# Altium PCB PCB1.PcbDoc (part 2 of 2)
Units mm, origin at the board's own origin, x right, y up, seen from the top; angles counter-clockwise.
Board outline 185 x 38 mm, 4 copper layers (Top Layer, POWER, GND, Bottom Layer), stack 0.603 mm thick; 116 components, 81 nets, 423 pads, 394 vias.
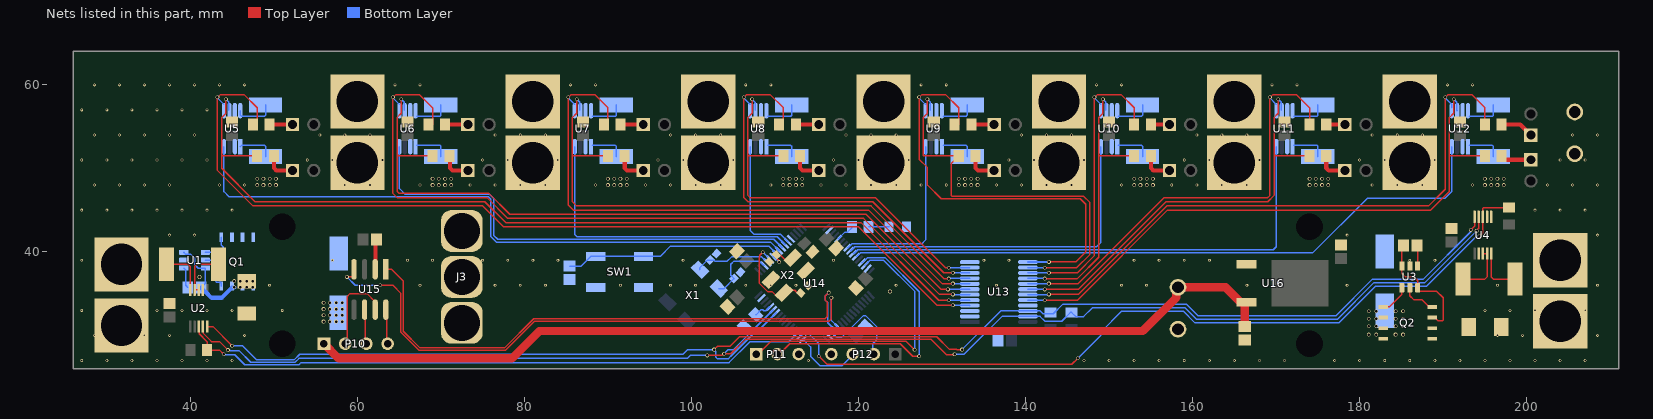
[diagram p4: the nets of this part, all layers, seen from the top]

## Via types
v1: diameter 0.35, hole 0.2, Top Layer to Bottom Layer, tented both sides, 221 vias
v2: diameter 0.45, hole 0.3, Top Layer to Bottom Layer, tented both sides, 171 vias
v3: diameter 0.5, hole 0.35, Top Layer to Bottom Layer, tented both sides, 2 vias

## Nets (pads, with @x,y where several pads share a name; then routed paths per layer and width w, separated by ;. In a path a pad name is that pad's centre, name@x,y a point inside that pad or via, vN(x,y) a via of type N, cw(c..) or ccw(c..) an arc to the next point about the centre after c; other vN are vias at no path point) (continued)
+5: C27.1 J2.1 P10.1 U16.3 | length 119
  Top Layer w0.5: U16.3@165.75,33.97 U16.3@166.45,33.97 U16.3@166.25,33.77
  Top Layer w1: P10.1@56,29 57.75,27.25 78.5,27.25 81.78,30.53 154.03,30.53 158.059,34.559 158.059,35.559 J2.1@158.25,35.75 163.97,35.75 U16.3@165.75,33.97 ; C27.1@166.25,31.056 U16.3@166.25,33.77
ALERT1: R4.1 U4.3 U14.50 | length 98.5
  Top Layer w0.18: v2(115.25,27.5) 116.217,26.533 145.533,26.533 v2(146.25,27.25) ; v2(194.315,41.87) 194.358,41.87 194.75,42.262 U4.3@194.75,44.2 194.75,45.195 194.855,45.3 R4.1@197.9,45.3
  Bottom Layer w0.18: U14.50@112.982,29.886 113.067,29.886 113.534,30.353 113.897,30.353 115.25,29 v2(115.25,27.5) ; v2(146.25,27.25) 149.022,30.022 149.022,30.422 151.492,32.892 158.892,32.892 160.284,31.5 177.5,31.5 181.89,35.89 187.998,35.89 193.978,41.87 v2(194.315,41.87)
ALERT2: R2.1 U2.3 U14.51 | length 76.1
  Top Layer w0.18: U2.3@41,31.05 41.06,30.99 41.06,30.19 42,29.25 R2.1@42,28.25 43.5,28.25 v2(44,27.75)
  Bottom Layer w0.18: v2(44,27.75) 44.052,27.698 44.247,27.698 44.264,27.681 45.319,27.681 46.504,26.496 52.998,26.496 53.252,26.75 104.5,26.75 107,29.25 111.639,29.25 U14.51@112.629,30.24
CAN_RX: U14.44 U15.4 | length 73.9
  Top Layer w0.18: v2(58.75,37) 58.79,37.04 59.391,37.04 59.595,37.244 U15.4@59.595,37.914 ; v2(62.75,36) 64.25,36 65.22,35.03 65.22,30.384 67.384,28.22 77.72,28.22 81.2,31.7 116.45,31.7 116.75,32 v2(116.75,34.5)
  Bottom Layer w0.18: v2(58.75,37) 59.75,36 v2(62.75,36) ; v2(116.75,34.5) 116.75,31.775 U14.44@117.578,30.947
CAN_TX: U14.45 U15.1 | length 70.2
  Top Layer w0.18: U15.1@63.405,37.914 64.086,37.914 65.5,36.5 65.5,30.5 67.5,28.5 77.604,28.5 81.104,32 116,32 116.25,32.25 116.25,34 116,34.25 116,34.695 v2(116.435,35.13)
  Bottom Layer w0.18: v2(116.435,35.13) 116,34.695 116,34.25 116.306,33.944 116.306,31.512 U14.45@117.225,30.593
GND: C2.1 C3.1 C5.1 C6.1 C7.1 C8.1 C9.1 C10.1 C11.1 C12.1 C13.1 C14.1 C15.2 C16.1 C17.1 C18.2 C19.1 C20.2 C21.2 C22.2 C23.2 C24.2 C25.2 C26.1 C27.2 C28.2 C29.1 D1.2 D2.2 D19.1 J1.2 J2.2 J3.2 P1.2 P2.2 P3.2 P4.2 P5.2 P6.2 P7.2 P8.2 P9.2 P10.4 P11.3 P12.4 R31.1 SW1.1 SW1.2 U1.2 U2.7 U3.2 U4.1 U4.2 U4.7 U5.2 U5.7 U6.2 U6.7 U7.2 U7.7 U8.2 U8.7 U9.2 U9.7 U10.2 U10.7 U11.2 U11.7 U12.2 U12.7 U13.2 U13.3 U13.12 U13.21 U14.12 U14.18 U14.31 U14.47 U14.63 U15.2 U15.8 U16.1 X2.2 X2.4 | length 7.8
  Top Layer w0.18: U15.8@63.405,33.086 63.49,33.002 63.49,29.13 P10.4@63.62,29
  Top Layer w0.5: U15.2@62.135,37.914 62.158,37.937 62.158,41.353 C26.1@62.306,41.5
  other v1: 27,27 30,27 33,27 36,27 39,27 42,27 45,27 114,27 147,27 150,27 153,27 156,27 159,27 162,27 165,27 168,27 171,27 177,27 180,27 183,27 186,27 189,27 192,27 195,27 198,27 201,27 204,27 207,27 28.5,30 34.5,30 37.5,30 46.5,30 196.5,30 199.5,30 208.5,30 27,33 36,33 39,33 42,33 45,33 51,33 195,33 198,33 201,33 207,33 49.5,36 67.5,36 76.5,36 79.5,36 82.5,36 91.5,36 97.5,36 100.5,36 106.5,36 109.5,36 112.5,36 124.5,36 136.5,36 151.5,36 154.5,36 166.5,36 178.5,36 196.5,36 208.5,36 27,39 57,39 66,39 69,39 75,39 78,39 81,39 84,39 99,39 117,39 135,39 138,39 153,39 156,39 159,39 162,39 186,39 189,39 37.5,42 40.5,42 178.5,42 208.5,42 27,45 30,45 33,45 36,45 39,45 42,45 45,45 201,45 204,45 207,45 28.5,48 31.5,48 34.5,48 37.5,48 43.5,48 46.5,48 58.5,48 61.5,48 67.5,48 73.5,48 76.5,48 79.5,48 82.5,48 88.5,48 94.5,48 97.5,48 100.5,48 103.5,48 109.5,48 115.5,48 118.5,48 121.5,48 124.5,48 127.5,48 130.5,48 136.5,48 139.5,48 142.5,48 145.5,48 151.5,48 157.5,48 160.5,48 163.5,48 166.5,48 181.5,48 184.5,48 187.5,48 193.5,48 202.5,48 205.5,48 208.5,48 27,51 30,51 33,51 36,51 39,51 42,51 54,51 57,51 63,51 75,51 78,51 84,51 96,51 99,51 105,51 117,51 120,51 126,51 138,51 141,51 147,51 159,51 162,51 168,51 180,51 183,51 189,51 204,51 207,51 28.5,54 31.5,54 34.5,54 37.5,54 40.5,54 55.5,54 58.5,54 61.5,54 76.5,54 79.5,54 82.5,54 97.5,54 100.5,54 103.5,54 118.5,54 121.5,54 124.5,54 139.5,54 142.5,54 145.5,54 160.5,54 163.5,54 166.5,54 181.5,54 184.5,54 187.5,54 205.5,54 208.5,54 27,57 30,57 33,57 36,57 39,57 42,57 28.5,60 31.5,60 34.5,60 37.5,60 40.5,60 43.5,60 46.5,60 64.5,60 67.5,60 85.5,60 88.5,60 106.5,60 109.5,60 127.5,60 130.5,60 148.5,60 151.5,60 169.5,60 172.5,60 190.5,60 193.5,60
  other v3: 123.75,35.25 41.1,37
GS1.1: R13.1 U5.5 U13.4 | length 114.1
  Top Layer w0.18: v2(43.25,58.5) 43.25,49.75 47.5,45.5 75,45.5 77.5,43 120,43 129.4,33.6 v2(131.3,33.6) ; v2@43.272,58.5 43.611,58.839 46.411,58.839 48,57.25 R13.1@48,55.25
  Bottom Layer w0.18: v2@43.25,58.428 U5.5@44.025,57.653 ; v2(131.3,33.6) 131.312,33.587 133.312,33.587 U13.4@133.325,33.575
GS1.2: R14.1 U5.6 U13.5 | length 110.3
  Top Layer w0.18: v2(44.257,58.27) 44.257,56.603 43.75,56.096 43.75,51.5 ; R14.1@48,51.5 43.75,51.5 ; v2(130.8,34.2) 129.6,34.2 120.3,43.5 77.75,43.5 75.25,46 47.75,46 43.75,50 43.75,51.5
  Bottom Layer w0.18: v2(44.257,58.27) 44.614,57.913 U5.6@44.614,56.962 ; v2(130.8,34.2) 130.813,34.213 133.312,34.213 U13.5@133.325,34.225
GS2.1: R15.1 U6.5 U13.6 | length 94.2
  Top Layer w0.18: v2(64.25,58.5) 64.25,47 64.75,46.5 75.5,46.5 78,44 120.6,44 129.7,34.9 v2(131.3,34.9) ; v2@64.272,58.5 64.611,58.839 67.411,58.839 69,57.25 R15.1@69,55.25
  Bottom Layer w0.18: v2@64.25,58.428 U6.5@65.025,57.653 ; v2(131.3,34.9) 131.312,34.888 133.312,34.888 U13.6@133.325,34.875
GS2.2: R16.1 U6.6 U13.7 | length 90.4
  Top Layer w0.18: v2(65.257,58.27) 65.257,56.603 64.75,56.096 64.75,51.5 ; R16.1@69,51.5 64.75,51.5 ; v2(130.7,35.5) 129.9,35.5 120.9,44.5 78.25,44.5 75.75,47 65,47 64.75,47.25 64.75,51.5
  Bottom Layer w0.18: v2(65.257,58.27) 65.614,57.913 U6.6@65.614,56.962 ; v2(130.7,35.5) 130.713,35.513 133.312,35.513 U13.7@133.325,35.525
GS3.1: R17.1 U7.5 U13.8 | length 73.5
  Top Layer w0.18: v2(85.25,58.5) 85.25,45.605 85.855,45 121.2,45 130,36.2 v2(131.3,36.2) ; v2@85.272,58.5 85.611,58.839 88.411,58.839 90,57.25 R17.1@90,55.25
  Bottom Layer w0.18: v2@85.25,58.428 U7.5@86.025,57.653 ; v2(131.3,36.2) 131.312,36.187 133.312,36.187 U13.8@133.325,36.175
GS3.2: R18.1 U7.6 U13.9 | length 69.6
  Top Layer w0.18: v2(86.257,58.27) 86.257,56.603 85.75,56.096 85.75,51.5 ; R18.1@90,51.5 85.75,51.5 ; v2(130.8,36.8) 130.2,36.8 121.5,45.5 86.25,45.5 85.75,46 85.75,51.5
  Bottom Layer w0.18: v2(86.257,58.27) 86.614,57.913 U7.6@86.614,56.962 ; v2(130.8,36.8) 130.813,36.813 133.312,36.813 U13.9@133.325,36.825
GS4.1: R19.1 U8.5 U13.10 | length 51.4
  Top Layer w0.18: v2(106.25,58.5) 106.25,46.5 106.75,46 121.7,46 130.2,37.5 v2(131.3,37.5) ; v2@106.272,58.5 106.611,58.839 109.411,58.839 111,57.25 R19.1@111,55.25
  Bottom Layer w0.18: v2@106.25,58.428 U8.5@107.025,57.653 ; v2(131.3,37.5) 131.312,37.488 133.312,37.488 U13.10@133.325,37.475
GS4.2: R20.1 U8.6 U13.11 | length 47.6
  Top Layer w0.18: v2(107.257,58.27) 107.257,56.603 106.75,56.096 106.75,51.423 ; R20.1@111,51.5 106.827,51.5 106.75,51.423 ; v2(130.8,38.1) 130.4,38.1 122,46.5 107,46.5 106.75,46.75 106.75,51.423
  Bottom Layer w0.18: v2(107.257,58.27) 107.614,57.913 U8.6@107.614,56.962 ; v2(130.8,38.1) 130.813,38.113 133.312,38.113 U13.11@133.325,38.125
GS5.1: R21.1 U9.5 U13.13 | length 52.6
  Top Layer w0.18: v2(127.25,58.5) 127.25,51.1 128.25,50.1 128.25,48 129.897,46.353 146.547,46.353 147.2,45.7 147.2,40 146,38.8 v2(142.8,38.8) ; v2@127.272,58.5 127.611,58.839 130.411,58.839 132,57.25 R21.1@132,55.25
  Bottom Layer w0.18: v2@127.25,58.428 U9.5@128.025,57.653 ; U13.13@140.275,38.775 140.288,38.788 142.787,38.788 v2(142.8,38.8)
GS5.2: R22.1 U9.6 U13.14 | length 49
  Top Layer w0.18: v2(128.257,58.27) 128.257,56.603 127.75,56.096 127.75,51.5 R22.1@132,51.5 131.117,50.617 131.117,46.739 131.222,46.633 146.967,46.633 147.7,45.9 147.7,39.7 146.1,38.1 v2(142.3,38.1)
  Bottom Layer w0.18: v2(128.257,58.27) 128.614,57.913 U9.6@128.614,56.962 ; U13.14@140.275,38.125 140.288,38.113 142.287,38.113 v2(142.3,38.1)
GS6.1: R23.1 U10.5 U13.15 | length 36.4
  Top Layer w0.18: v2(142.8,37.5) 146.2,37.5 148.25,39.55 v2(148.25,58.5) ; v2@148.272,58.5 148.611,58.839 151.411,58.839 153,57.25 R23.1@153,55.25
  Bottom Layer w0.18: U13.15@140.275,37.475 142.775,37.475 v2(142.8,37.5) ; v2@148.25,58.428 U10.5@149.025,57.653
GS6.2: R24.1 U10.6 U13.16 | length 34.4
  Top Layer w0.18: v2(142.3,36.8) 146.2,36.8 148.75,39.35 148.75,51.5 ; v2(149.257,58.27) 149.257,56.603 148.75,56.096 148.75,51.5 ; R24.1@153,51.5 148.75,51.5
  Bottom Layer w0.18: U13.16@140.275,36.825 140.288,36.813 142.287,36.813 v2(142.3,36.8) ; v2(149.257,58.27) 149.614,57.913 U10.6@149.614,56.962
GS7.1: R25.1 U11.5 U13.17 | length 53.7
  Top Layer w0.18: v2(142.8,36.2) 146.3,36.2 156.6,46.5 169,46.5 169.25,46.75 v2(169.25,58.5) ; v2@169.272,58.5 169.611,58.839 172.411,58.839 174,57.25 R25.1@174,55.25
  Bottom Layer w0.18: U13.17@140.275,36.175 140.288,36.188 142.787,36.188 v2(142.8,36.2) ; v2@169.25,58.428 U11.5@170.025,57.653
GS7.2: R26.1 U11.6 U13.18 | length 51.6
  Top Layer w0.18: v2(142.3,35.5) 146.3,35.5 156.8,46 169,46 169.75,46.75 169.75,51.5 ; v2(170.257,58.27) 170.257,56.603 169.75,56.096 169.75,51.5 ; R26.1@174,51.5 169.75,51.5
  Bottom Layer w0.18: U13.18@140.275,35.525 140.288,35.513 142.287,35.513 v2(142.3,35.5) ; v2(170.257,58.27) 170.614,57.913 U11.6@170.614,56.962
GS8.1: R27.1 U12.5 U13.19 | length 75.3
  Top Layer w0.18: v2(142.8,34.9) 146.3,34.9 156.9,45.5 188.25,45.5 190.25,47.5 v2(190.25,58.5) 190.272,58.5 190.611,58.839 193.411,58.839 195,57.25 R27.1@195,55.25
  Bottom Layer w0.18: U13.19@140.275,34.875 140.288,34.887 142.787,34.887 v2(142.8,34.9) ; v2(190.25,58.5) 190.25,58.428 191.025,57.653 U12.5@191.025,57.24
GS8.2: R28.1 U12.6 U13.20 | length 73.1
  Top Layer w0.18: v2(142.3,34.2) 146.2,34.2 157,45 188.5,45 190.75,47.25 190.75,51.5 ; v2@191.279,58.248 v2(191.257,58.27) 191.257,56.603 190.75,56.096 190.75,51.5 ; R28.1@195,51.625 R28.1@195,51.5 190.75,51.5
  Bottom Layer w0.18: U13.20@140.275,34.225 140.288,34.213 142.287,34.213 v2(142.3,34.2) ; v2(191.257,58.27) 191.614,57.913 191.614,56.962 U12.6@191.675,56.901
NetC1_1: C1.1 D1.1 Q1.1 Q1.2 Q1.3 R1.2 U1.3 U1.6 U2.8 U2.9 | length 17.6
  Top Layer w0.18: U2.8@41,35.45 U2.9@40.5,35.45 40.5,38.25 40.75,38.5 R1.2@43.35,38.5
  Bottom Layer w0.18: U1.3@39.2,39.95 39.41,39.74 40.01,39.74 40.5,39.25 40.5,38.5 40.95,38.05 U1.6@41.8,38.05 41.8,36.244 C1.1@41.306,35.75
  Bottom Layer w0.5: C1.1@41.306,35.75 41.306,35.674 41.708,35.272 41.784,35.272 42.556,34.5 43.75,34.5 45,35.75 v2(45.25,35.75)
  other v2: 46,35.75 46.75,35.75 47.5,35.75 45.25,36.5 46,36.5 46.75,36.5 47.5,36.5
NetC1_2: C1.2 U1.1 | length 2.5
  Bottom Layer w0.18: U1.1@39.2,38.05 39.24,38.05 39.45,37.84 39.45,35.994 C1.2@39.694,35.75
NetC2_2: C2.2 C5.2 J3.1 Q1.5 Q1.6 Q1.7 Q1.8 Q2.5 Q2.6 Q2.7 Q2.8 U1.4 U3.4 | length 7.5
  Top Layer w0.18: Q2.5@182.829,33.405 183.555,33.405 185.05,34.9 U3.4@185.05,35.7
  Bottom Layer w0.18: U1.4@41.8,39.95 43.7,39.95 43.925,40.175 43.925,40.621 43.71,40.836 Q1.5@43.71,41.75
  other v2: 181.1,30.1 182,30.1 184.3,30.1 185.2,30.1 181.1,31.1 182,31.1 184.3,31.1 185.2,31.1 55.95,31.65 56.7,31.65 57.45,31.65 58.2,31.65 181.1,32 182,32 184.3,32 185.2,32 55.95,32.4 56.7,32.4 57.45,32.4 58.2,32.4 181.1,32.9 182,32.9 184.3,32.9 185.2,32.9 55.95,33.15 56.7,33.15 57.45,33.15 58.2,33.15 55.95,33.9 56.7,33.9 57.45,33.9 58.2,33.9
NetC4_1: C4.1 D2.1 Q2.1 Q2.2 Q2.3 R3.2 U3.3 U3.6 U4.8 U4.9 | length 20.6
  Top Layer w0.18: C4.1@185.25,40.75 185.05,40.55 U3.3@185.05,38.3 185.05,37.45 185.5,37 186.5,37 186.95,36.55 U3.6@186.95,35.7 186.95,35.501 187.16,35.291 189.209,35.291 190,34.5 190,31.855 189.895,31.75 189.386,31.75 189.001,32.135 Q2.3@188.671,32.135 ; R3.2@192.4,36.75 195,36.75 195.25,37 U4.9@195.25,39.8 U4.8@194.75,39.8
NetC4_2: C4.2 U3.1 | length 2.5
  Top Layer w0.18: C4.2@186.862,40.75 186.95,40.662 U3.1@186.95,38.3
NetC16_2: C16.2 U14.3 X1.1 | length 8.6
  Bottom Layer w0.18: X1.1@103.276,35.613 103.913,35.613 C16.2@105.1,36.8 105.107,36.807 104.7,37.213 104.7,38.507 105.093,38.9 108.126,38.9 108.655,38.371 U14.3@108.74,38.371
NetC17_2: C17.2 U14.4 X1.4 | length 9.3
  Bottom Layer w0.18: X1.4@101.013,37.876 101.013,38.113 101.918,39.018 C17.2@102.218,39.018 102.224,39.024 102.671,39.024 102.82,38.876 104.269,38.876 104.793,39.4 108.418,39.4 U14.4@109.093,38.725
NetC18_1: C18.1 U14.6 X2.1 | length 4.4
  Top Layer w0.18: v2(110.501,38.777) 110.45,38.829 110.45,38.996 110.174,39.271 C18.1@110.174,39.674 110.577,39.674 111.187,39.064 111.909,39.064 X2.1@112.13,39.286
  Bottom Layer w0.18: U14.6@109.8,39.517 U14.6@109.8,39.432 109.823,39.432 110.478,38.777 v2(110.501,38.777)
NetC21_1: C21.1 U14.5 X2.3 | length 11.1
  Top Layer w0.18: v2(108.532,39.957) 108.181,39.606 108.181,39.481 108.093,39.393 108.093,36.267 109.111,35.248 109.648,35.248 110.066,34.831 110.787,34.831 X2.3@111.07,35.114 111.353,35.397 112.352,35.397 112.673,35.076 C21.1@113.076,35.076
  Bottom Layer w0.18: v2(108.532,39.957) 108.568,39.957 U14.5@109.447,39.078
NetC29_2: C29.2 SW1.3 SW1.4 U14.7 | length 26.1
  Bottom Layer w0.18: C29.2@85.4,38.306 86.806,38.306 87.95,39.45 SW1.3@88.55,39.45 SW1.4@94.25,39.45 96.25,39.45 97.5,40.7 109.239,40.7 U14.7@110.154,39.786
NetD3_1: D3.1 R13.2 | length 2.7
  Top Layer w0.5: R13.2@49.5,55.25 D3.1@52.23,55.25
NetD4_1: D4.1 R14.2 | length 3.8
  Top Layer w0.5: R14.2@50,51.5 50,50.043 50.293,49.75 D4.1@52.23,49.75
NetD5_1: D5.1 R15.2 | length 2.7
  Top Layer w0.5: R15.2@70.5,55.25 D5.1@73.23,55.25
NetD6_1: D6.1 R16.2 | length 3.7
  Top Layer w0.5: R16.2@71,51.5 71.1,51.4 71.1,50.043 71.393,49.75 D6.1@73.23,49.75
NetD7_1: D7.1 R17.2 | length 2.7
  Top Layer w0.5: R17.2@91.5,55.25 D7.1@94.23,55.25
NetD8_1: D8.1 R18.2 | length 3.8
  Top Layer w0.5: R18.2@92,51.5 92,50.043 92.293,49.75 D8.1@94.23,49.75
NetD9_1: D9.1 R19.2 | length 2.7
  Top Layer w0.5: R19.2@112.5,55.25 D9.1@115.23,55.25
NetD10_1: D10.1 R20.2 | length 3.8
  Top Layer w0.5: R20.2@113,51.5 113,50.043 113.293,49.75 D10.1@115.23,49.75
NetD11_1: D11.1 R21.2 | length 2.7
  Top Layer w0.5: R21.2@133.5,55.25 D11.1@136.23,55.25
NetD12_1: D12.1 R22.2 | length 3.8
  Top Layer w0.5: R22.2@134,51.5 134,50.043 134.293,49.75 D12.1@136.23,49.75
NetD13_1: D13.1 R23.2 | length 2.2
  Top Layer w0.5: R23.2@155,55.25 D13.1@157.23,55.25
NetD14_1: D14.1 R24.2 | length 3.8
  Top Layer w0.5: R24.2@155,51.5 155,50.043 155.293,49.75 D14.1@157.23,49.75
NetD15_1: D15.1 R25.2 | length 2.2
  Top Layer w0.5: R25.2@176,55.25 D15.1@178.23,55.25
NetD16_1: D16.1 R26.2 | length 3.8
  Top Layer w0.5: R26.2@176,51.5 176,50.043 176.293,49.75 D16.1@178.23,49.75
NetD17_1: D17.1 R27.2 | length 4
  Top Layer w0.5: R27.2@197,55.25 199.23,55.25 D17.1@200.5,53.98
NetD18_1: D18.1 R28.2 | length 3.8
  Top Layer w0.5: R28.2@197,51.5 197,51.375 197.355,51.02 D18.1@200.5,51.02
NetD19_2: D19.2 R29.2 | length 2.4
  Bottom Layer w0.18: R29.2@121.2,43 D19.2@123.65,43
NetJ1_1: J1.1 R12.1 U12.8 | length 4.2
  Bottom Layer w0.18: U12.8@193.122,56.25 195.895,56.25 196,56.355 R12.1@196,57.6
NetP1_1: P1.1 R1.1 U2.10 | length 5.8
  Top Layer w0.18: R1.1@37.15,38.5 39.75,38.5 40,38.25 U2.10@40,35.45
NetP2_1: P2.1 R3.1 U4.10 | length 5.8
  Top Layer w0.18: U4.10@195.75,39.8 195.75,37 196,36.75 R3.1@198.6,36.75 R3.1@198.55,36.8
NetP3_1: P3.1 R5.1 U5.8 | length 4.9
  Bottom Layer w0.18: U5.8@45.975,56.901 45.975,56.397 46.122,56.25 48.895,56.25 49,56.355 R5.1@49,57.6
NetP4_1: P4.1 R6.1 U6.8 | length 4.2
  Bottom Layer w0.18: U6.8@67.122,56.25 69.895,56.25 70,56.355 R6.1@70,57.6
NetP5_1: P5.1 R7.1 U7.8 | length 4.2
  Bottom Layer w0.18: U7.8@88.122,56.25 90.895,56.25 91,56.355 R7.1@91,57.6
NetP6_1: P6.1 R8.1 U8.8 | length 4.2
  Bottom Layer w0.18: U8.8@109.122,56.25 111.895,56.25 112,56.355 R8.1@112,57.6
NetP7_1: P7.1 R9.1 U9.8 | length 4.2
  Bottom Layer w0.18: U9.8@130.122,56.25 132.895,56.25 133,56.355 R9.1@133,57.6
NetP8_1: P8.1 R10.1 U10.8 | length 4.2
  Bottom Layer w0.18: U10.8@151.122,56.25 153.895,56.25 154,56.355 R10.1@154,57.6
NetP9_1: P9.1 R11.1 U11.8 | length 4.2
  Bottom Layer w0.18: U11.8@172.122,56.25 174.895,56.25 175,56.355 R11.1@175,57.6
NetP10_2: P10.2 U15.7 | length 10.6
  Top Layer w0.18: P10.2@58.54,29 58.793,29.253 58.793,29.758 58.8,29.765 58.8,34.695 59.105,35 61.145,35 62.135,34.01 U15.7@62.135,33.086
NetP10_3: P10.3 U15.6 | length 4.2
  Top Layer w0.18: U15.6@60.865,33.086 60.95,33.002 60.95,29.13 P10.3@61.08,29
NetQ1_4: Q1.4 U1.5 | length 4.6
  Bottom Layer w0.18: U1.5@41.8,39 42.645,39 42.75,38.895 42.75,36.75 43.123,36.377 43.571,36.377 43.71,36.238 Q1.4@43.71,35.908
NetQ2_4: Q2.4 U3.5 | length 4.2
  Top Layer w0.18: U3.5@186,35.7 186,34.75 186.5,34.25 187.496,34.25 188.341,33.405 Q2.4@188.671,33.405
NetR31_2: R31.2 U14.60 | length 2.2
  Bottom Layer w0.18: R31.2@107.707,32.457 108.322,33.072 108.537,33.072 108.655,32.955 108.895,32.955 109.362,33.422 U14.60@109.447,33.422
NetU5_4: U5.4 U14.8 | length 77.4
  Bottom Layer w0.18: U5.4@44.025,52.599 44.025,47.225 44.67,46.58 75.72,46.58 75.964,46.337 75.964,41.836 76.626,41.174 109.473,41.174 U14.8@110.507,40.139
NetU6_4: U6.4 U14.9 | length 56.4
  Bottom Layer w0.18: U6.4@65.025,52.599 65.025,47.575 65.7,46.9 75.8,46.9 76.323,46.377 76.323,41.977 76.8,41.5 109.854,41.5 U14.9@110.861,40.493
NetU7_4: U7.4 U14.10 | length 36.2
  Bottom Layer w0.18: U7.4@86.025,52.599 86.025,42.075 86.3,41.8 110.261,41.8 U14.10@111.214,40.846
NetU8_4: U8.4 U14.11 | length 15.1
  Bottom Layer w0.18: U8.4@107.025,52.599 107.025,42.575 107.5,42.1 110.668,42.1 U14.11@111.568,41.2
NetU9_4: U9.4 U14.24 | length 20.9
  Bottom Layer w0.18: U14.24@118.639,40.493 118.724,40.493 119.191,40.959 127.559,40.959 128.025,41.425 U9.4@128.025,52.599
NetU10_4: U10.4 U14.25 | length 41.9
  Bottom Layer w0.18: U14.25@118.993,40.139 119.077,40.139 119.544,40.606 148.506,40.606 149.025,41.125 U10.4@149.025,52.599
NetU11_4: U11.4 U14.26 | length 63
  Bottom Layer w0.18: U14.26@119.346,39.846 119.492,39.846 119.898,40.252 169.652,40.252 170.025,40.625 U11.4@170.025,52.599
NetU12_4: U12.4 U14.27 | length 79.9
  Bottom Layer w0.18: U14.27@119.7,39.432 119.785,39.432 120.265,39.912 134.688,39.912 134.7,39.9 137.957,39.9 137.97,39.912 174.412,39.912 180.9,46.4 190.2,46.4 191.025,47.225 U12.4@191.025,52.599
PA5: R29.1 U14.21 | length 2.3
  Bottom Layer w0.18: U14.21@117.578,41.553 118.39,42.365 118.69,42.365 119.2,42.875 R29.1@119.2,43
SCL: R32.1 U2.5 U4.5 U13.22 U14.58 | length 174.6
  Top Layer w0.18: U2.5@42,31.05 42.7,31.05 v2(45,28.75) ; v2(102.7,28.3) 103.1,28.7 104.604,28.7 105.744,29.84 129.36,29.84 130.881,28.319 131.736,28.319 131.755,28.3 v2(132.4,28.3) ; v2(193.307,42.622) 193.75,43.065 U4.5@193.75,44.2
  Bottom Layer w0.18: v2(45,28.75) 46.25,28.75 47.944,27.056 52.397,27.056 53.091,27.75 99,27.75 99.55,28.3 v2(102.7,28.3) 102.7,28.26 102.9,28.06 102.9,27.4 103.069,27.231 104.436,27.231 104.818,27.613 104.818,27.618 107.398,30.198 107.637,30.198 U14.58@110.154,32.714 ; v2(132.4,28.3) 137.025,32.925 U13.22@140.275,32.925 141.765,32.925 142.09,32.6 143.2,32.6 143.325,32.6 144.477,33.752 159.248,33.752 159.374,33.626 159.5,33.5 160.64,32.36 177.16,32.36 181.55,36.75 187.642,36.75 193.307,42.415 v2(193.307,42.622)
SDA: R30.1 U2.4 U4.4 U13.23 U14.59 | length 174.7
  Top Layer w0.18: U2.4@41.5,31.05 41.56,30.99 41.56,30.234 42.529,29.265 43.485,29.265 v2(44.5,28.25) ; v2(101.9,27.6) 103.627,27.6 103.827,27.8 v2(103.9,27.8) 104.7,27.8 106.46,29.56 128.644,29.56 130.506,27.698 131.448,27.698 v2(131.5,27.75) ; v2(194,42.5) 194,42.573 194.25,42.823 U4.4@194.25,44.2
  Bottom Layer w0.18: v2(44.5,28.25) 44.552,28.198 44.747,28.198 44.764,28.181 45.819,28.181 47.224,26.776 52.526,26.776 53,27.25 99.5,27.25 99.85,27.6 v2(101.9,27.6) ; v2(103.9,27.8) 104.4,28.3 105.032,28.3 U14.59@109.8,33.068 ; v2(131.5,27.75) 131.519,27.731 132.636,27.731 137.18,32.275 U13.23@140.275,32.275 141.74,32.275 142.315,31.7 144.325,31.7 145.375,32.75 R30.1@145.5,32.75 146,32.25 146.95,32.25 148.022,33.322 159.07,33.322 159.196,33.196 160.462,31.93 177.33,31.93 181.72,36.32 187.82,36.32 v2(194,42.5)
SWCLK: P12.3 U14.49 | length 8.5
  Bottom Layer w0.18: U14.49@113.336,29.532 114.25,28.618 114.25,27.5 115.359,26.391 118.061,26.391 119.29,27.62 P12.3@119.29,27.75
SWDIO: P12.2 U14.46 | length 10.7
  Bottom Layer w0.18: U14.46@116.871,30.24 116.928,30.24 117.417,29.75 117.95,29.75 120.536,32.336 120.886,32.336 122.2,31.022 122.2,29.5 121.71,29.01 121.71,27.87 P12.2@121.83,27.75
USART_RX: P11.1 U14.30 | length 34.9
  Top Layer w0.18: P11.1@107.75,27.75 107.86,27.64 107.915,27.695 109.5,29.28 125.72,29.28 126.711,28.289 v2(126.711,28.269)
  Bottom Layer w0.18: U14.30@120.76,38.371 121.389,39 123,39 126.75,35.25 126.75,28.308 v2(126.711,28.269)
USART_TX: P11.2 U14.29 | length 34.6
  Top Layer w0.18: P11.2@110.29,27.75 110.51,27.75 111.76,29 125,29 126.5,27.5 v2(127.25,27.5)
  Bottom Layer w0.18: U14.29@120.407,38.725 120.492,38.725 121.047,39.28 123.22,39.28 127.28,35.22 127.28,27.53 v2(127.25,27.5)
VCC: J3.3 R5.2 R6.2 R7.2 R8.2 R9.2 R10.2 R11.2 R12.2 U5.1 U6.1 U7.1 U8.1 U9.1 U10.1 U11.1 U12.1 | length 33.5
  Bottom Layer w0.18: U5.1@45.975,52.599 46.126,52.75 48.895,52.75 49,52.645 R5.2@49,51.4 ; U6.1@67.126,52.75 69.895,52.75 70,52.645 R6.2@70,51.4 ; U7.1@88.126,52.75 90.895,52.75 91,52.645 R7.2@91,51.4 ; U8.1@109.126,52.75 111.895,52.75 112,52.645 R8.2@112,51.4 ; U9.1@130.126,52.75 132.895,52.75 133,52.645 R9.2@133,51.4 ; U10.1@151.126,52.75 153.895,52.75 154,52.645 R10.2@154,51.4 ; U11.1@172.126,52.75 174.895,52.75 175,52.645 R11.2@175,51.4 ; U12.1@193.126,52.75 195.895,52.75 196,52.645 R12.2@196,51.4
  other v2: 48,48 48.75,48 49.5,48 50.25,48 69,48 69.75,48 70.5,48 71.25,48 90,48 90.75,48 91.5,48 92.25,48 111,48 111.75,48 112.5,48 113.25,48 132,48 132.75,48 133.5,48 134.25,48 153,48 153.75,48 154.5,48 155.25,48 174,48 174.75,48 175.5,48 176.25,48 195,48 195.75,48 196.5,48 197.25,48 48,48.75 48.75,48.75 49.5,48.75 50.25,48.75 69,48.75 69.75,48.75 70.5,48.75 71.25,48.75 90,48.75 90.75,48.75 91.5,48.75 92.25,48.75 111,48.75 111.75,48.75 112.5,48.75 113.25,48.75 132,48.75 132.75,48.75 133.5,48.75 134.25,48.75 153,48.75 153.75,48.75 154.5,48.75 155.25,48.75 174,48.75 174.75,48.75 175.5,48.75 176.25,48.75 195,48.75 195.75,48.75 196.5,48.75 197.25,48.75
pads on no net: U13.1 U14.2 U14.14 U14.15 U14.16 U14.17 U14.20 U14.22 U14.23 U14.28 U14.33 U14.34 U14.35 U14.36 U14.37 U14.38 U14.39 U14.40 U14.41 U14.42 U14.43 U14.52 U14.53 U14.54 U14.55 U14.56 U14.57 U14.61 U14.62 U15.5 X1.2 X1.3

## Polygon pours and split planes (outlines as drawn)
GND on Bottom Layer "GND_L04_P044" (solid, pour order 44): 26,64 26,26 211,26 211,64
NetC2_2 on Bottom Layer "NETC2_2_L04_P017" (solid, pour order 17): 181.9,35 180.6,33.7 180.6,29 187.3,29 187.3,33.6 187.1,33.8 185.3,33.8 184.1,35
VCC on Bottom Layer "VCC_L04_P027" (solid, pour order 27): 198,52.25 194,52.25 194,47.45 198,47.45
VCC on Bottom Layer "VCC_L04_P026" (solid, pour order 26): 177,52.25 173,52.25 173,47.45 177,47.45
VCC on Bottom Layer "VCC_L04_P025" (solid, pour order 25): 156,52.25 152,52.25 152,47.45 156,47.45
VCC on Bottom Layer "VCC_L04_P024" (solid, pour order 24): 135,52.25 131,52.25 131,47.45 135,47.45
VCC on Bottom Layer "VCC_L04_P023" (solid, pour order 23): 114,52.25 110,52.25 110,47.45 114,47.45
VCC on Bottom Layer "VCC_L04_P022" (solid, pour order 22): 93,52.25 89,52.25 89,47.45 93,47.45
VCC on Bottom Layer "VCC_L04_P021" (solid, pour order 21): 72,52.25 68,52.25 68,47.45 72,47.45
VCC on Bottom Layer "VCC_L04_P020" (solid, pour order 20): 51,52.3 47,52.3 47,47.5 51,47.5
NetC2_2 on Bottom Layer "NETC2_2_L04_P011" (solid, pour order 11): 43.5,42.3 43.57,42.23 43.57,37.508 49.292,37.508 56.2,30.6 58.9,30.6 58.9,35.8 58.6,36.1 56.7,36.1 51.9,40.9 49.5,40.9 49.3,41.1 48.1,42.3
NetC1_1 on Bottom Layer "NETC1_1_L04_P010" (solid, pour order 10): 47.8,35.3 44.9,35.3 44.8,35.4 44.8,36.8 47.8,36.8
NetJ1_1 on Bottom Layer "NETJ1_1_L04_P007" (solid, pour order 7): 194,56.7 194,59.7 195.6,61.3 210.3,61.3 210.3,54.7 203.7,54.7 203.7,55.4 202.4,56.7 201.6,56.7 198,56.7
NetP9_1 on Bottom Layer "NETP9_1_L04_P006" (solid, pour order 6): 173,56.7 173,59.7 174.6,61.3 189.3,61.3 189.3,54.7 182.7,54.7 182.7,55.4 181.4,56.7 180.6,56.7 177,56.7
NetP8_1 on Bottom Layer "NETP8_1_L04_P005" (solid, pour order 5): 152,56.7 152,59.7 153.6,61.3 168.3,61.3 168.3,54.7 161.7,54.7 161.7,55.4 160.4,56.7 159.6,56.7 156,56.7
NetP7_1 on Bottom Layer "NETP7_1_L04_P004" (solid, pour order 4): 131,56.7 131,59.7 132.6,61.3 147.3,61.3 147.3,54.7 140.7,54.7 140.7,55.4 139.4,56.7 138.6,56.7 135,56.7
NetP6_1 on Bottom Layer "NETP6_1_L04_P003" (solid, pour order 3): 110,56.7 110,59.7 111.6,61.3 126.3,61.3 126.3,54.7 119.7,54.7 119.7,55.4 118.4,56.7 117.6,56.7 114,56.7
NetP5_1 on Bottom Layer "NETP5_1_L04_P002" (solid, pour order 2): 89,56.7 89,59.7 90.6,61.3 105.3,61.3 105.3,54.7 98.7,54.7 98.7,55.4 97.4,56.7 96.6,56.7 93,56.7
NetP4_1 on Bottom Layer "NETP4_1_L04_P001" (solid, pour order 1): 68,56.7 68,59.7 69.6,61.3 84.3,61.3 84.3,54.7 77.7,54.7 77.7,55.4 76.4,56.7 75.6,56.7 72,56.7
NetP3_1 on Bottom Layer "NETP3_1_L04_P000" (solid, pour order 0): 47,56.7 47,59.7 48.6,61.3 63.3,61.3 63.3,54.7 56.7,54.7 56.7,55.4 55.4,56.7 54.6,56.7 51,56.7
GND on Top Layer "GND_L01_P045" (solid, pour order 45): 26,64 26,26 211,26 211,64
NetC2_2 on Top Layer "NETC2_2_L01_P016" (solid, pour order 16): 187.1,33.8 187.3,33.6 187.3,29 180.6,29 180.6,33.6 180.8,33.8
NetC4_1 on Top Layer "NETC4_1_L01_P013" (solid, pour order 13): 193.9,33.9 193.3,34.5 193.3,38.8 190.5,38.8 189.8,38.1 189.8,32.9 189.3,32.4 188.1,32.4 188.1,29.3 193.9,29.3
NetP2_1 on Top Layer "NETP2_1_L01_P012" (solid, pour order 12): 207.3,42.3 199.3,42.3 197.7,40.7 197.7,34.7 199.5,34.7 200.5,35.7 207.3,35.7
NetC1_1 on Top Layer "NETC1_1_L01_P009" (solid, pour order 9): 42.4,36.5 44.5,36.5 44.8,36.2 44.8,35.4 47.9,35.4 47.9,39.6 47,40.5 42.4,40.5
NetP1_1 on Top Layer "NETP1_1_L01_P008" (solid, pour order 8): 28.4,41.8 28.4,35.2 36.8,35.2 38.1,36.5 38.1,40.7 37,41.8 35,41.8
NetC2_2 on POWER "NETC2_2_L02_P018" (solid, pour order 18): 69.6,34 69.6,28.8 170.4,28.8 172.6,31 175.3,31 177.3,29 186.6,29 187,29.4 187,32.9 186.3,33.6 186.2,33.5 179,33.5 177.3,35.2 169.3,35.2 168.1,34
VCC on POWER "VCC_L02_P037" (solid, pour order 37): 198,46 198,42 181,42 181,46
NetC2_2 on POWER "NETC2_2_L02_P015" (solid, pour order 15): 67,34 65.5,35.5 56,35.5 55.5,35 55.5,31 55.9,30.6 64.4,30.6 66.2,28.8 75.1,28.8 75.1,33.9 75,34
VCC on POWER "VCC_L02_P035" (solid, pour order 35): 51,50.25 51,45.25 47,45.25 47,50.25
VCC on POWER "VCC_L02_P042" (solid, pour order 42): 54,42 53.25,42.75 53.25,44.5 52.5,45.25 47,45.25 47,48 47.25,48.25 55,48.25 56.75,46.5 56.75,42
VCC on POWER "VCC_L02_P034" (solid, pour order 34): 72,50.25 72,45.25 68,45.25 68,50.25
VCC on POWER "VCC_L02_P033" (solid, pour order 33): 93,50.25 93,45.25 89,45.25 89,50.25
VCC on POWER "VCC_L02_P032" (solid, pour order 32): 114,50.25 114,45.25 110,45.25 110,50.25
VCC on POWER "VCC_L02_P031" (solid, pour order 31): 135,50.25 135,45.25 131,45.25 131,50.25
VCC on POWER "VCC_L02_P030" (solid, pour order 30): 156,50.25 156,45.25 152,45.25 152,50.25
VCC on POWER "VCC_L02_P029" (solid, pour order 29): 177,50.25 177,45.25 173,45.25 173,50.25
VCC on POWER "VCC_L02_P036" (solid, pour order 36): 171,46 171,42 54,42 54,46
VCC on POWER "VCC_L02_P041" (solid, pour order 41): 169.75,42 173,45.25 177,45.25 180.25,42 181,42 181,46 178.5,48.5 172.25,48.5 169.75,46
VCC on POWER "VCC_L02_P028" (solid, pour order 28): 198,50.25 198,45.25 194,45.25 194,50.25
GND on GND "GND_L03_P043" (solid, pour order 43): 26,26 26,64 211,64 211,26

## Keep-outs
Keep-Out Layer:
  the board outline again, w0.5

## Silkscreen, mask and mechanical layers (free items; w line width, h text height)
Top Overlay:
  drawing of 17 lines, arcs and shapes, not listed
  text "Zentral fuer / Energie / und / Strommessung" at 82.5,31.737 h1.27
  text "RX" at 108.385,29.192 h1.27 r90
  text "TX" at 110.885,29.192 h1.27 r90
  text "3V" at 125.135,29.192 h1.27 r90
  text "DIO" at 122.635,29.163 h1.27 r90
  text "GND" at 112.807,29.115 h1.27
  text "CLK" at 119.885,29.057 h1.27 r90
  text "MG 2023" at 85.2,27.365 h1.27
Bottom Overlay:
  text "BAT OUT" at 209.732,46.365 h1.27
  text "5V IN" at 163.865,30.893 h1.27 r270
  text "UART" at 106.078,27.115 h1.27
  text "DEBUG" at 131.962,27.115 h1.27
Mechanical 1:
  lines w0.2: 26,26 211,26 211,64 26,64 26,26 ; 48,26 177,26 177,46 48,46 48,26

## Text inside footprints (layer, text, board x,y; h text height)
J1: Bottom Overlay "+" at 206.65,58.05 h3 r270; Bottom Overlay "-" at 207.25,48.75 h3 r270
J2: Bottom Overlay "-" at 159.75,27.75 h3 r270; Bottom Overlay "+" at 159.15,37.05 h3 r270